# Altium PCB DT.PcbDoc (part 2 of 2)
Units mil, origin at the board's own origin, x right, y up, seen from the top; angles counter-clockwise.
Board outline 1771.65 x 787.4 mil, 2 copper layers (Top Layer, Bottom Layer), stack 57 mil thick; 61 components, 48 nets, 194 pads, 36 vias.
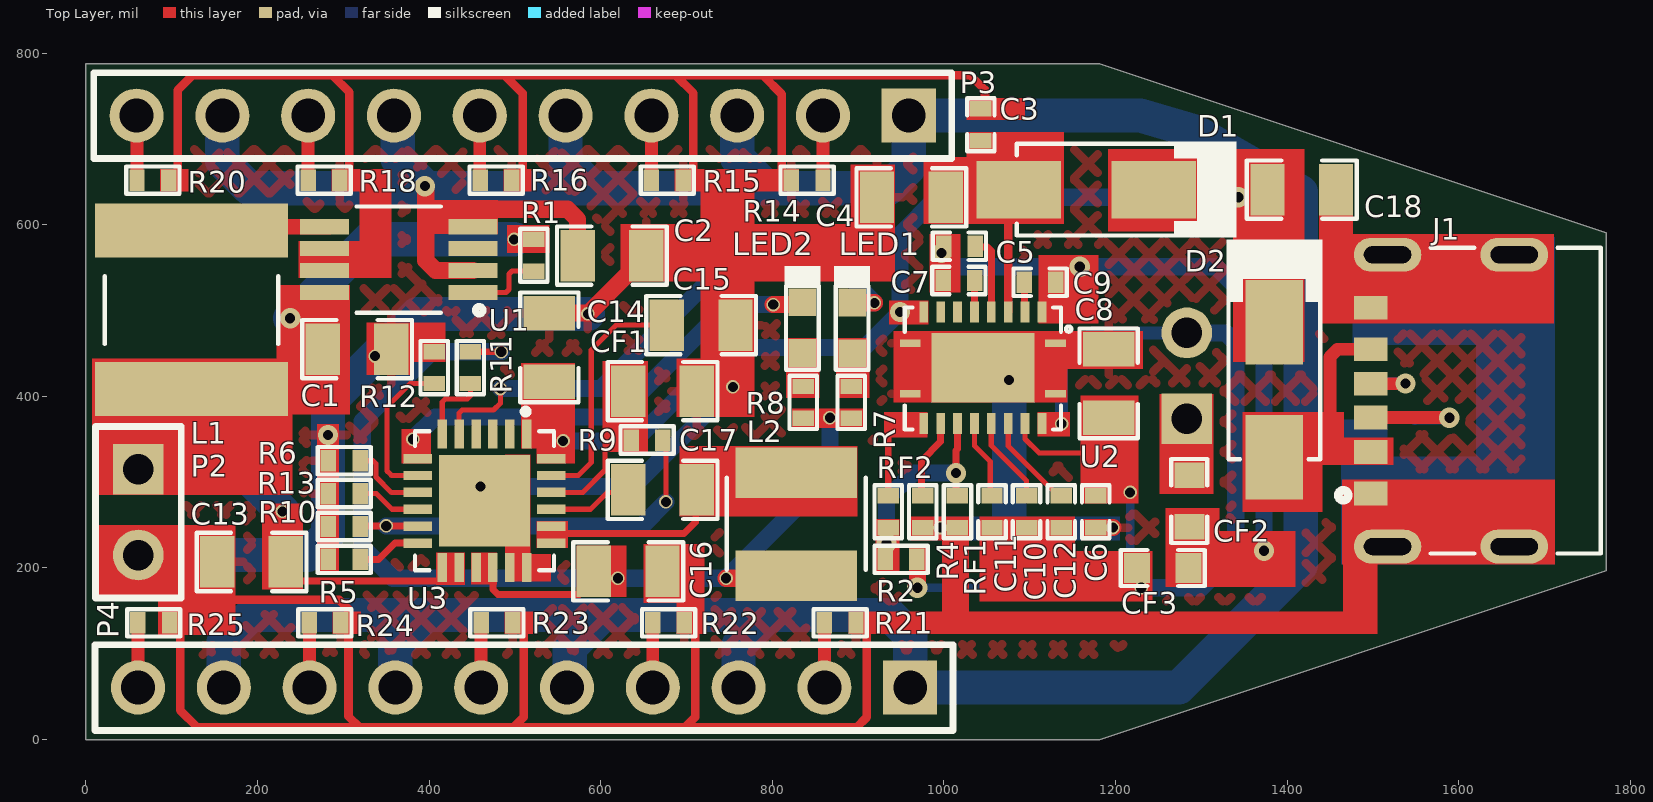
[diagram p0: Top Layer view]

## Part data (continued)
U1: "IC LED DRV RGLTR PWM 550MA 8MSOP", Case/Package=MSOP, Frequency=1MHz, Manufacturer=Microchip, Max Operating Temperature=85°C, Max Supply Voltage=5V, Min Operating Temperature=-40°C, Output Current=550mA, Package Quantity=2500, Supplier Part Number 1=579-MCP1643T-I/MS, Category="LED Drivers", ComponentLink1Description=http://www.mouser.com/ds/2/268/20005208A-708734.pdf?src-supplier=Mouser, ComponentLink1URL=http://www.mouser.com/ds/2/268/20005208A-708734.pdf?src-supplier=Mouser, ComponentLink2Description=http://www.microchip.com/mymicrochip/filehandler.aspx?ddocname=en565730&src-supplier=Digi-Key, ComponentLink2URL=http://www.microchip.com/mymicrochip/filehandler.aspx?ddocname=en565730&src-supplier=Digi-Key, Dimming=PWM, Manufacturer Part Number=MCP1643T-I/MS, Mount="Surface Mount", Number of Outputs=1, Output Current per Channel=550mA, Output Voltage=5V, Packaging="Tape and Reel", Pricing 1="1=1.33000, 10=1.33000, 50=1.12000, 100=1.02000, 1000=1.02000, 10000=1.02000 (USD)", RoHS=Yes, RoHS Compliant=Yes, Stock 1=22, Supplier 1=Mouser, Switching Frequency=1MHz, Topology=Boost, Weight=0.004938oz
U2: "IC WIRELESS PWR RCVR 20QFN", Case/Package=VQFN, Manufacturer="Texas Instruments", Max Operating Temperature=125°C, Min Operating Temperature=0°C, Operating Supply Current=8mA, Output Current=1.5A, Output Voltage=5V, Package Quantity=3000, Supplier Part Number 1=296-38885-6-ND, ComponentLink1Description=http://www.ti.com/lit/ds/symlink/bq51013b.pdf?src-supplier=Digi-Key, ComponentLink1URL=http://www.ti.com/lit/ds/symlink/bq51013b.pdf?src-supplier=Digi-Key, Contact Plating=Gold, Lead Free="Lead Free", Logic Function=Receiver, Manufacturer Part Number=BQ51013BRHLR, Mount="Surface Mount", Number of Pins=20, Packaging="Tape and Reel", Pricing 1="1=3.49, 10=3.119, 25=2.8068, 100=2.5572, 250=2.30768, 500=2.07068, 1000=1.74636 (USD)", Stock 1=15402, Supplier 1=Digi-Key
U3: "IC BATT CHG LI-ION 1CELL 24WQFN", Manufacturer="Texas Instruments", Supplier Part Number 1=595-BQ25616JRTWR, Category="Battery Management", ComponentLink1Description=http://www.ti.com/general/docs/suppproductinfo.tsp?distId=10&amp;gotoUrl=http%3A%2F%2Fwww.ti.com%2Flit%2Fgpn%2Fbq25616&src-supplier=Digi-Key, ComponentLink1URL=http://www.ti.com/general/docs/suppproductinfo.tsp?distId=10&amp;gotoUrl=http%3A%2F%2Fwww.ti.com%2Flit%2Fgpn%2Fbq25616&src-supplier=Digi-Key, Manufacturer Part Number=BQ25616JRTWR, Pricing 1="1=3.06000, 10=2.75000, 25=2.60000, 50=2.60000, 100=2.26000, 250=2.14000, 500=1.92000, 1000=1.68000, 3000=1.67000, 10000=1.67000 (USD)", RoHS=Yes, Supplier 1=Mouser

## Via types
v1: diameter 15.75, hole 11.81, Top Layer to Bottom Layer, tented both sides, 22 vias
v2: diameter 23.62, hole 11.81, Top Layer to Bottom Layer, tented both sides, 14 vias

## Nets (pads, with @x,y where several pads share a name; then routed paths per layer and width w, separated by ;. In a path a pad name is that pad's centre, name@x,y a point inside that pad or via, vN(x,y) a via of type N, cw(c..) or ccw(c..) an arc to the next point about the centre after c; other vN are vias at no path point)
+5: C2.1 P3.1 P3.3 P3.5 P3.7 P3.9 P4.1 P4.3 P4.5 P4.7 P4.9 U1.2 U1.4 | length 4198.9
  Top Layer w20: v2(395,645) 395,644.02 396,643.02 396,607.08 ; 398,607.08 396,605.08 396,558.31 407.72,546.59 U1.2 ; 467,616 469,618 561.28,618 573,606.28 C2.1
  Bottom Layer w40: P3.9 158.98,674.24 190.54,642.68 392.68,642.68 v2(395,645) ; P4.9 160.63,113.63 192.2,145.2 395.8,145.2 ; P3.7 363.38,722.84 363.38,676.62 v2(395,645) ; P4.7 360.63,110.02 395.8,145.2 ; P3.5 558.98,674.24 590.54,642.68 ; P4.5 563.83,63.83 563.83,106.83 602.2,145.2 ; P3.3 758.98,677.85 794.15,642.68 ; P4.3 760.63,110.02 795.8,145.2 ; v2(395,645) 397.32,642.68 590.54,642.68 ; 395.8,145.2 602.2,145.2 ; 590.54,642.68 794.15,642.68 ; 602.2,145.2 795.8,145.2 ; 794.15,642.68 935.15,642.68 958.98,666.5 P3.1 1228.96,727.24 1292.35,708.52 1416,638.11 1416,203 1273.63,60.63 P4.1 960.63,121.37 936.8,145.2 795.8,145.2
+VBAT: C1.1 C13.1 L1.1 P2.1 R1.2 U1.8 U3.13 U3.14 | length 694
  Top Layer w8: C13.1@229,197.5 232.5,197.5 C13.1@244,186 ; C13.1@244,185 U3.13@411.99,185 ; U3.13@411.99,186 415.26,189.27 U3.13
  Top Layer w20: v2@238,488 v2(238,491)
  Bottom Layer w40: P2.1 180,315 v1(229,266) ; v2(238,491) 330,583 v1(499,583)
AC1_: C5.1 C7.1 C9.1 CF2.1 CF3.2 U2.2 | length 738.1
  Top Layer w8: v2(997,567) 997,572.5 C5.1 ; U2.2@1116.25,502 1116.25,496.25 1132.5,512.5 C9.1@1132.5,532
  Bottom Layer w8: v2(1158.33,551) v2@1160,551
  Bottom Layer w20: v2(997,567) 1013,551 v2(1158.33,551) ; v2@1160,551 1317,551 1373,495 v2(1373,220)
AC2_: C10.1 C11.1 C12.1 CF3.1 P1.2 U2.19 | length 688.1
  Top Layer w6: U2.19 1114.75,368 v1(1137,368) ; v1(1230,177) v1@1230,181
  Bottom Layer w15: v1(1137,368) 1137,438 1173,474 P1.2@1271,474
  Bottom Layer w20: v1(1230,177) 1300,177 1340,217 1340,462.28 1328.28,474 P1.2 ; P1.2@1271,474 P1.2@1277,468
Boot1_: C9.2 U2.3 | length 33.8
  Top Layer w8: C9.2@1094.03,532 1094.03,498.95 U2.3
Boot2_: C12.2 U2.17 | length 112.1
  Top Layer w6: U2.17 1074.88,342.28 1133.17,284 C12.2
C_VCC: C14.1 C18.2 D1.1 D2.1 U2.9 U3.1 U3.24 | length 988.3
  Top Layer w8: v2(948.69,498.42) U2.9
  Top Layer w20: v1@556,345 v1(556,348)
  Bottom Layer w20: v1(556,348) 639,348 748,457 907.27,457 v2(948.69,498.42) 948.69,588.69 992,632 v2(1343,632)
CE_: R6.2 U3.9 | length 91.6
  Top Layer w6: R6.2 334.49,325 338,321.49 338,306 355.91,288.09 U3.9
CLMP1_: C5.2 U2.5 | length 91.9
  Top Layer w8: C5.2 1037.5,574 1050.51,574 1055.2,569.31 U2.5
CLMP2_: C10.2 U2.16 | length 101.5
  Top Layer w6: U2.16 1055.2,342.8 1096.33,301.67 C10.2
COM1_: C7.2 U2.6 | length 36.8
  Top Layer w8: U2.6 1035.76,498.66 1035.76,534.76 C7.2
COM2_: C11.2 U2.15 | length 92.2
  Top Layer w6: U2.15 1035.51,342.49 1054,324 C11.2@1054,284
FOD_: R2.1 RF1.2 RF2.1 U2.14 | length 229.9
  Top Layer w8: RF1.2@1014,284 v2(1014,310.5) 1014,337 1015.83,338.83 U2.14
  Bottom Layer w20: v2(933,229) 933,280 963.5,310.5 v2(1014,310.5)
GND: C1.2 C2.2 C3.2 C4.2 C6.2 C8.2 C13.2 C14.2 C15.2 C16.2 C18.1 CF1.2 J1.A12 J1.B12 J1.MH1 J1.MH2 J1.MH3 J1.MH4 P2.2 R4.1 R5.1 R6.1 R10.1 R12.2 R13.2 R14.2 R15.2 R16.2 R17.1 R18.2 R19.1 R20.2 R21.2 R22.2 R23.2 R24.2 R25.2 RF1.1 U1.6 U1.7 U2.1 U2.10 U2.11 U2.20 U2.21 U3.17 U3.18 U3.25 | length 4975.7
  Top Layer w6: R20.2 96.5,655.5 102.5,661.5 R20.2@103.49,661.5 ; 107,143 110,140 ; 129,186 152,163 ; 307,658.5 313.5,652 ; v1(337,447) 345,455 C1.2 ; R23.2 510,136 ; R16.2@503,652 509,658 ; R15.2 696,655.5 702,661.5 R15.2@704.49,661.5 ; 797,652 801,652 811,662
  Top Layer w10: 107,665.01 107,757 124,774 287.5,774 ; 110,140 110,34 130,14 319,14 ; 152,163 295,163 306,152 306,27 319,14 ; 307,658.5 307,754.5 287.5,774 ; 509,658 509,753 488,774 ; 510,136 510,26 498,14 ; 708,665.01 708,753.5 687.5,774 ; 710,136 710,26 698,14 ; 811,662 811,752 789,774 ; 910,136 910,26 898,14 698,14 ; 1060.5,735 1055.86,735 1047.86,743 1047.86,757.14 1031,774 789,774 ; 287.5,774 488,774 ; 319,14 498,14 ; 488,774 687.5,774 ; 498,14 698,14 ; 687.5,774 789,774
  Top Layer w20: v1(460,295) 460,282.72 U3.25 500.78,241.94 500.78,214.41 U3.18@515.19,200 ; C14.2 v1@585,497 ; v1@586,497 633,544 643,544 653,554 C2.2 ; C6.2 v1(1197,247)
  Top Layer w40: 1457,547 C18.1 ; 1485,144 J1.MH1@1485,219
  Bottom Layer w20: v1(460,295) 638,295 v1(754,411)
  Bottom Layer w40: P2.2 258.57,215 282,238.43 v2(282,355) 282,392 v1(337,447) 386,496 v1(585,496) ; 1076,252 v2(1076,419)
  other v1: 995.67,247
ILIM: RF2.2 U2.12 | length 123.2
  Top Layer w8: RF2.2 935,363.81 939.69,368.5 U2.12
NetC17_1: C17.1 U3.21 | length 107.9
  Top Layer w6: U3.21 588,268.4 607.6,288 C17.1@642,288
NetCF2_2: CF2.2 P1.1
NetD2_2: D2.2 J1.A9 J1.B9 | length 204.1
  Top Layer w15: J1.B9 1458.79,335.16 1450,343.94 1450,446.06 1458.79,454.84 J1.A9
NetJ1_A5: J1.A5 R17.2 | length 78.8
  Top Layer w15: J1.A5 1537.69,414.68 v2(1538,415)
  Bottom Layer w15: R17.2@1500,415 v2(1538,415)
NetJ1_B5: J1.B5 R19.2 | length 132.2
  Top Layer w15: J1.B5 1588.69,375.32 v2(1589,375)
  Bottom Layer w15: R19.2 1549.5,374.5 1588.5,374.5 v2(1589,375)
NetLED1_1: LED1.1 R7.1
NetLED2_1: LED2.1 R8.1
NetP3_2: P3.2 R14.1 | length 74.7
  Top Layer w15: R14.1@858.98,652.52 P3.2
NetP3_4: P3.4 R15.1 | length 74.7
  Top Layer w15: R15.1@658.98,652.52 P3.4
NetP3_6: P3.6 R16.1 | length 74.7
  Top Layer w15: R16.1@458.98,652.52 P3.6
NetP3_8: P3.8 R18.1 | length 74.7
  Top Layer w15: R18.1@258.98,652.52 P3.8
NetP3_10: P3.10 R20.1 | length 74.7
  Top Layer w15: R20.1 P3.10@59.5,726.72
NetP4_2: P4.2 R21.1 | length 74.7
  Top Layer w15: P4.2 R21.1@860.63,135.35
NetP4_4: P4.4 R22.1 | length 74.7
  Top Layer w15: P4.4 R22.1@660.63,135.35
NetP4_6: P4.6 R23.1 | length 74.7
  Top Layer w15: P4.6 R23.1@460.63,135.35
NetP4_8: P4.8 R24.1 | length 74.7
  Top Layer w15: P4.8 R24.1@260.63,135.35
NetP4_10: P4.10 R25.1 | length 74.7
  Top Layer w15: P4.10 R25.1@60.63,135.35
NetR1_1: R1.1 U1.1 | length 91.9
  Top Layer w6: U1.1 489.49,521 493,524.51 493,542.49 496.51,546 R1.1
NetR11_1: R11.1 U3.6 | length 87.6
  Top Layer w6: U3.6 415.26,393.49 418.77,397 444.49,397 448,400.51 R11.1
NetR12_1: R12.1 U3.8 | length 179.1
  Top Layer w6: U3.8 356.23,307.77 354.02,309.98 351,313 351,388 378,415 R12.1
NetR13_1: R13.1 U3.10 | length 74.8
  Top Layer w6: R13.1 338.33,286.67 356.6,268.4 U3.10
OUT_: C3.1 C4.1 D1.2 U2.4 | length 111.5
  Top Layer w8: 1074.88,605 1076.88,607 1079,607
  Top Layer w10: U2.4 1074.88,605
PG_: LED2.2 U3.7 | length 520.1
  Top Layer w20: v1(801,507) 832.47,507 LED2.2
  Bottom Layer w20: v1(381,350) 407,376 618,376 749,507 v1(801,507)
PMID_: C15.1 U3.23 | length 284.1
  Top Layer w6: U3.23 573.77,307.77 589,323 589,454 618,483 C15.1
RECT_: C6.1 C8.1 R2.2 U2.18 | length 526.9
  Top Layer w6: U2.18 1094.57,350.43 1111,334 1186,334 ; C6.1 1177,316
  Top Layer w20: v2(969,177) R2.2@969,209.5
  Bottom Layer w10: v2(969,177) 1195,177 1217,199 v1(1217,288)
REGN_: CF1.1 R9.1 U3.22 | length 128.5
  Top Layer w6: U3.22 579.09,288.09 605,314 605,369
STAT_: LED1.2 U3.5 | length 627.7
  Top Layer w6: U3.5 434.94,380.49 438.46,384 475,384 483,392 v1(483,409)
  Top Layer w20: LED1.2 893.44,509 v1(919,509)
  Bottom Layer w20: v1(483,409) 600,409 736,545 883,545 v1(919,509)
SW#: C17.2 L2.1 U3.19 U3.20 | length 204.4
  Top Layer w8: 546,240 697,240 710.69,253.69 710.69,287.28 C17.2@711,287.6
SW_: L1.2 U1.5 | length 162.5
  Top Layer w18: L1.2@127.25,597.77 U1.5@283.77,597.77
  Top Layer w20: L1.2 L1.2@127.25,597.77
SYS: C16.1 L2.2 R7.2 R8.2 R11.2 U3.15 U3.16 | length 1300.7
  Top Layer w6: C16.1@575,169 592,186 C16.1
  Top Layer w8: R11.2 v1(484,452) ; U3.16 474.31,174.69 480,169 C16.1@575,169
  Top Layer w20: v1(746,188) 825.04,188 L2.2
  Bottom Layer w20: v1(484,452) 403,452 322,371 322,224 358,188 v1(620,188) v1(746,188) 867,309 v1(867,375)
TS-CTRL_: R4.2 U2.13 | length 93.7
  Top Layer w8: R4.2@973.81,284 973.81,324.81 996.14,347.14 U2.13
TS_: R9.2 R10.2 U3.11 | length 478.9
  Top Layer w6: R10.2 R10.2@320.17,249 ; v1(350,249) v1@350.14,248.86 ; U3.11@386.57,248.86 U3.11 ; R9.2 676,345.5 v1(676,277)
  Top Layer w8: R10.2@320.17,249 v1(350,249) ; v1@350.14,248.86 U3.11@386.57,248.86
  Bottom Layer w20: v1(350,249) 350.28,248.72 647.72,248.72 v1(676,277)
VSET_: R5.2 U3.12 | length 75.1
  Top Layer w8: R5.2 341,210 360.03,229.03 U3.12
pads on no net: U1.3 U2.7 U2.8 U3.2 U3.3 U3.4

## Polygon pours and split planes (outlines as drawn)
GND on Top Layer "NONET_L-01_P-001" (hatched 45Degree grid 25 track 10, pour order 0): 1191,688 99,688 99,99 1179,99 1673,264 1673,522
GND on Bottom Layer "NONET_L-01_P-001" (hatched 45Degree grid 25 track 10, pour order 1): 1191,688 99,688 99,99 1179,99 1673,264 1673,522

## Other copper
Top Layer:
  rectangle net SYS: 449,181 479,218
  rectangle net GND: 1026.5,722 1094.5,748
  rectangle net GND: 998,144 1029,237
  rectangle net ILIM: 930,352 981,382
  rectangle net GND: 1437,484.92 1710.98,589
  rectangle net GND: 1464,204 1712,303
  rectangle net AC1_: 1300,178 1410,243
  rectangle net AC1_: 1110,485 1180,565
  rectangle net GND: 650,159 694,228
  rectangle net GND: 891,551 943,670
  rectangle net GND: 623,534 943,601
  rectangle net GND: 688,376 734,444
  rectangle net GND: 716,376 779,665
  rectangle net SYS: 572,166 630,226
  rectangle net GND: 327,425 378,448
  rectangle net GND: 327,440 419,486
  rectangle net PG_: 368,322 402,362
  region net GND: 341,665 286,665 286,639 341,639
  rectangle net GND: 319,538 356,665
  region net GND: 831,665 763,665 763,639 831,639
  region net GND: 719,665 686,665 686,639 719,639
  region net GND: 119.5,665 86.5,665 86.5,639 119.5,639
  region net GND: 519.5,665 486.5,665 486.5,639 519.5,639
  rectangle net GND: 287.5,123 320.5,149
  rectangle net GND: 889,123 1505,149
  rectangle net GND: 688,123 721,228
  rectangle net GND: 488,123 521,149
  rectangle net GND: 13,168 115,250
  rectangle net GND: 84,122 174,250
  rectangle net +5: 386,589 480,629
  rectangle net +VBAT: 491,567 540,600
  rectangle net C_VCC: 525,322 570,348
  rectangle net C_VCC: 507,339 570,439
  rectangle net NetLED1_1: 874,397.91 913,467.91
  rectangle net NetLED2_1: 816,398 855,468
  rectangle net SYS: 823,363 908,386
  rectangle net SW#: 692,260 899,342
  rectangle net REGN_: 602,335 655,441
  region net SW#: 562,223 562,255 525,255 525,223
  rectangle net GND: 488.37,202 518,332
  rectangle net GND: 488.37,184 542,216
  rectangle net +VBAT: 408,180 442,218
  rectangle net +VBAT: 7,285 241,444
  rectangle net +VBAT: 222,379 308,529.59
  rectangle net GND: 248,538 356,581
  rectangle net +VBAT: 205,175 253,275
  rectangle net GND: 269,196 295,368
  rectangle net GND: 1161,237 1178,257
  rectangle net RECT_: 959,209 979,224
  rectangle net AC2_: 1147,161 1243,220
  region net AC2_: 1153,161 1153,260 1041.67,260 1041.67,161
  region net GND: 1029,232 1029,260 961,260 961,232
  rectangle net FOD_: 920,196 948,257
  region net AC1_: 1321,270 1258,270 1258,178 1321,178
  rectangle net NetCF2_2: 1251,286 1314,403
  rectangle net GND: 1135,432 1232,476
  rectangle net GND: 941,393 1144,476
  rectangle net C_VCC: 936,484 982,512
  rectangle net NetD2_2: 1348,265 1441,349
  rectangle net RECT_: 1159,275 1227,401
  rectangle net AC2_: 1109,353 1147,382
  rectangle net AC1_: 983,521 1019,589
  rectangle net OUT_: 1026,663 1140,708
  rectangle net OUT_: 976,601 1140,679
  rectangle net C_VCC: 1191,592 1354,688
  rectangle net C_VCC: 1337,440 1420,688
  rectangle net NetD2_2: 1348,320 1466,382
  rectangle net NetD2_2: 1454.39,320 1524,352
  pour cut-out: 744,157 914,157 914,343.36 744,343.36 744,343
  pour cut-out: 8,630 239,630 239,373 7,373 7,630
Bottom Layer:
  rectangle net GND: 986,232 1205,260
  rectangle net GND: 1620,240 1712,523
  rectangle net GND: 1476,460 1712,586
  rectangle net GND: 1476,204 1712,330
  rectangle net GND: 1463,204 1517.02,373

## Silkscreen, mask and mechanical layers (free items; w line width, h text height)
Bottom Overlay:
  drawing of 3075 lines, arcs and shapes, not listed
  text "+5" at 140.7,627 h60 r270
  text "+5" at 340.7,627 h60 r270
  text "+5" at 540.7,627 h60 r270
  text "+5" at 740.7,627 h60 r270
  text "+5" at 940.7,627 h60 r270
  text "VBAT" at 242,295 h60
  text "ZERO CARBON FOOTPRINT" at 842.5,284.46 h16.2
  text "GND" at 209,195.7 h60
  text "+5" at 140.7,109 h60 r270
  text "+5" at 340.7,109 h60 r270
  text "+5" at 540.7,109 h60 r270
  text "+5" at 740.7,109 h60 r270
  text "+5" at 940.7,109 h60 r270
Mechanical 2:
  the board outline again, w10
Drill Drawing:
  drawing of 337 lines, arcs and shapes, not listed
  text "Symbol" at 2400.5,2060.94 h72
  text "Count" at 2906.38,2060.94 h72
  text "Hole Size" at 3446.24,2060.94 h72
  text "Plated" at 4545.92,2060.94 h72
  text "Hole Type" at 5051.79,2060.94 h72
  text "Drill Layer Pair" at 5785.59,2060.94 h72
  text "Via/Pad" at 7285.14,2060.94 h72
  text "Pad Shape" at 7874.99,2060.94 h72
  text "Template" at 8620.79,2060.94 h72
  text "Description" at 9270.62,2060.94 h72
  text "Hole Tolerance (+)" at 10124.38,2060.94 h72
  text "Hole Tolerance (-)" at 11457.99,2060.94 h72
  text "Hole Length" at 12791.6,2060.94 h72
  text "Routed Path Length" at 13871.29,2060.94 h72
  text "4" at 2906.38,1910.94 h60
  text "19.69mil (0.500mm)" at 3446.24,1910.94 h60
  text "PTH" at 4545.92,1910.94 h60
  text "Slot" at 5051.79,1910.94 h60
  text "Top Layer - Bottom Layer" at 5785.59,1910.94 h60
  text "Pad" at 7285.14,1910.94 h60
  text "Rounded" at 7874.99,1910.94 h60
  text "(Mixed)" at 8620.79,1910.94 h60
  text "55.12mil (1.400mm)" at 12791.6,1910.94 h60
  text "35.43mil (0.900mm)" at 13871.29,1910.94 h60
  text "4" at 2906.38,1760.94 h60
  text "35.43mil (0.900mm)" at 3446.24,1760.94 h60
  text "PTH" at 4545.92,1760.94 h60
  text "Round" at 5051.79,1760.94 h60
  text "Top Layer - Bottom Layer" at 5785.59,1760.94 h60
  text "Pad" at 7285.14,1760.94 h60
  text "(Mixed)" at 7874.99,1760.94 h60
  text "(Mixed)" at 8620.79,1760.94 h60
  text "-" at 12791.6,1760.94 h60
  text "-" at 13871.29,1760.94 h60
  text "20" at 2906.38,1610.94 h60
  text "39.37mil (1.000mm)" at 3446.24,1610.94 h60
  text "PTH" at 4545.92,1610.94 h60
  text "Round" at 5051.79,1610.94 h60
  text "Top Layer - Bottom Layer" at 5785.59,1610.94 h60
  text "Pad" at 7285.14,1610.94 h60
  text "(Mixed)" at 7874.99,1610.94 h60
  text "(Mixed)" at 8620.79,1610.94 h60
  text "-" at 12791.6,1610.94 h60
  text "-" at 13871.29,1610.94 h60
  text "36" at 2906.38,1460.94 h60
  text "11.81mil (0.300mm)" at 3446.24,1460.94 h60
  text "PTH" at 4545.92,1460.94 h60
  text "Round" at 5051.79,1460.94 h60
  text "Top Layer - Bottom Layer" at 5785.59,1460.94 h60
  text "Via" at 7285.14,1460.94 h60
  text "Rounded" at 7874.99,1460.94 h60
  text "(Mixed)" at 8620.79,1460.94 h60
  text "-" at 12791.6,1460.94 h60
  text "-" at 13871.29,1460.94 h60
  text "64 Total" at 2906.38,1310.94 h60
  text "Slot definitions :" at 2400.5,1165.97 h60
  text "Routed Path Length" at 3433.19,1165.97 h60
  text "= Calculated from tool start centre position to tool end centre position." at 4535.86,1165.97 h60
  text "Hole Length" at 3433.19,1065.99 h60
  text "= Routed Path Length + Tool Size = Slot length as defined in the PCB layout" at 4125.99,1065.99 h60
  text "Layer" at 2369.41,848.46 h60
  text "Name" at 2779.32,848.46 h60
  text "Material" at 3709.06,848.46 h60
  text "Thickness" at 4568.83,848.46 h60
  text "Constant" at 5218.66,848.46 h60
  text "Board Layer Stack" at 5788.53,848.46 h60
  text "Top Overlay" at 2779.32,728.46 h60
  text "Top Solder" at 2779.32,608.46 h60
  text "Solder Resist" at 3709.06,608.46 h60
  text "3.00mil" at 4568.83,608.46 h60
  text "3.5" at 5218.66,608.46 h60
  text "1" at 2369.41,488.46 h60
  text "Top Layer" at 2779.32,488.46 h60
  text "10.00mil" at 4568.83,488.46 h60
  text "Dielectric 1" at 2779.32,368.46 h60
  text "FR-4" at 3709.06,368.46 h60
  text "37.00mil" at 4568.83,368.46 h60
  text "4.8" at 5218.66,368.46 h60
  text "2" at 2369.41,248.46 h60
  text "Bottom Layer" at 2779.32,248.46 h60
  text "10.00mil" at 4568.83,248.46 h60
  text "Bottom Solder" at 2779.32,128.46 h60
  text "Solder Resist" at 3709.06,128.46 h60
  text "3.00mil" at 4568.83,128.46 h60
  text "3.5" at 5218.66,128.46 h60
  text "Bottom Overlay" at 2779.32,8.46 h60

## Dimensions
0,787.4 to 1181.1,787.4 on Mechanical 13
0,787.4 to 0,0 on Mechanical 13
0,0 to 1181.1,0 on Mechanical 13
1771.65,590.55 to 1771.65,196.85 on Mechanical 13
1181.1,787.4 to 1771.65,590.55 on Mechanical 13
1771.65,196.85 to 1181.1,0 on Mechanical 13